# Altium PCB System.PcbDoc
Units mm, origin at the board's own origin, x right, y up, seen from the top; angles counter-clockwise.
Board outline 78 x 65.9 mm, 2 copper layers (Top Layer, Bottom Layer); 25 components, 40 nets, 249 pads, 7 vias.
Unrouted connection lines stored in the file: 14.
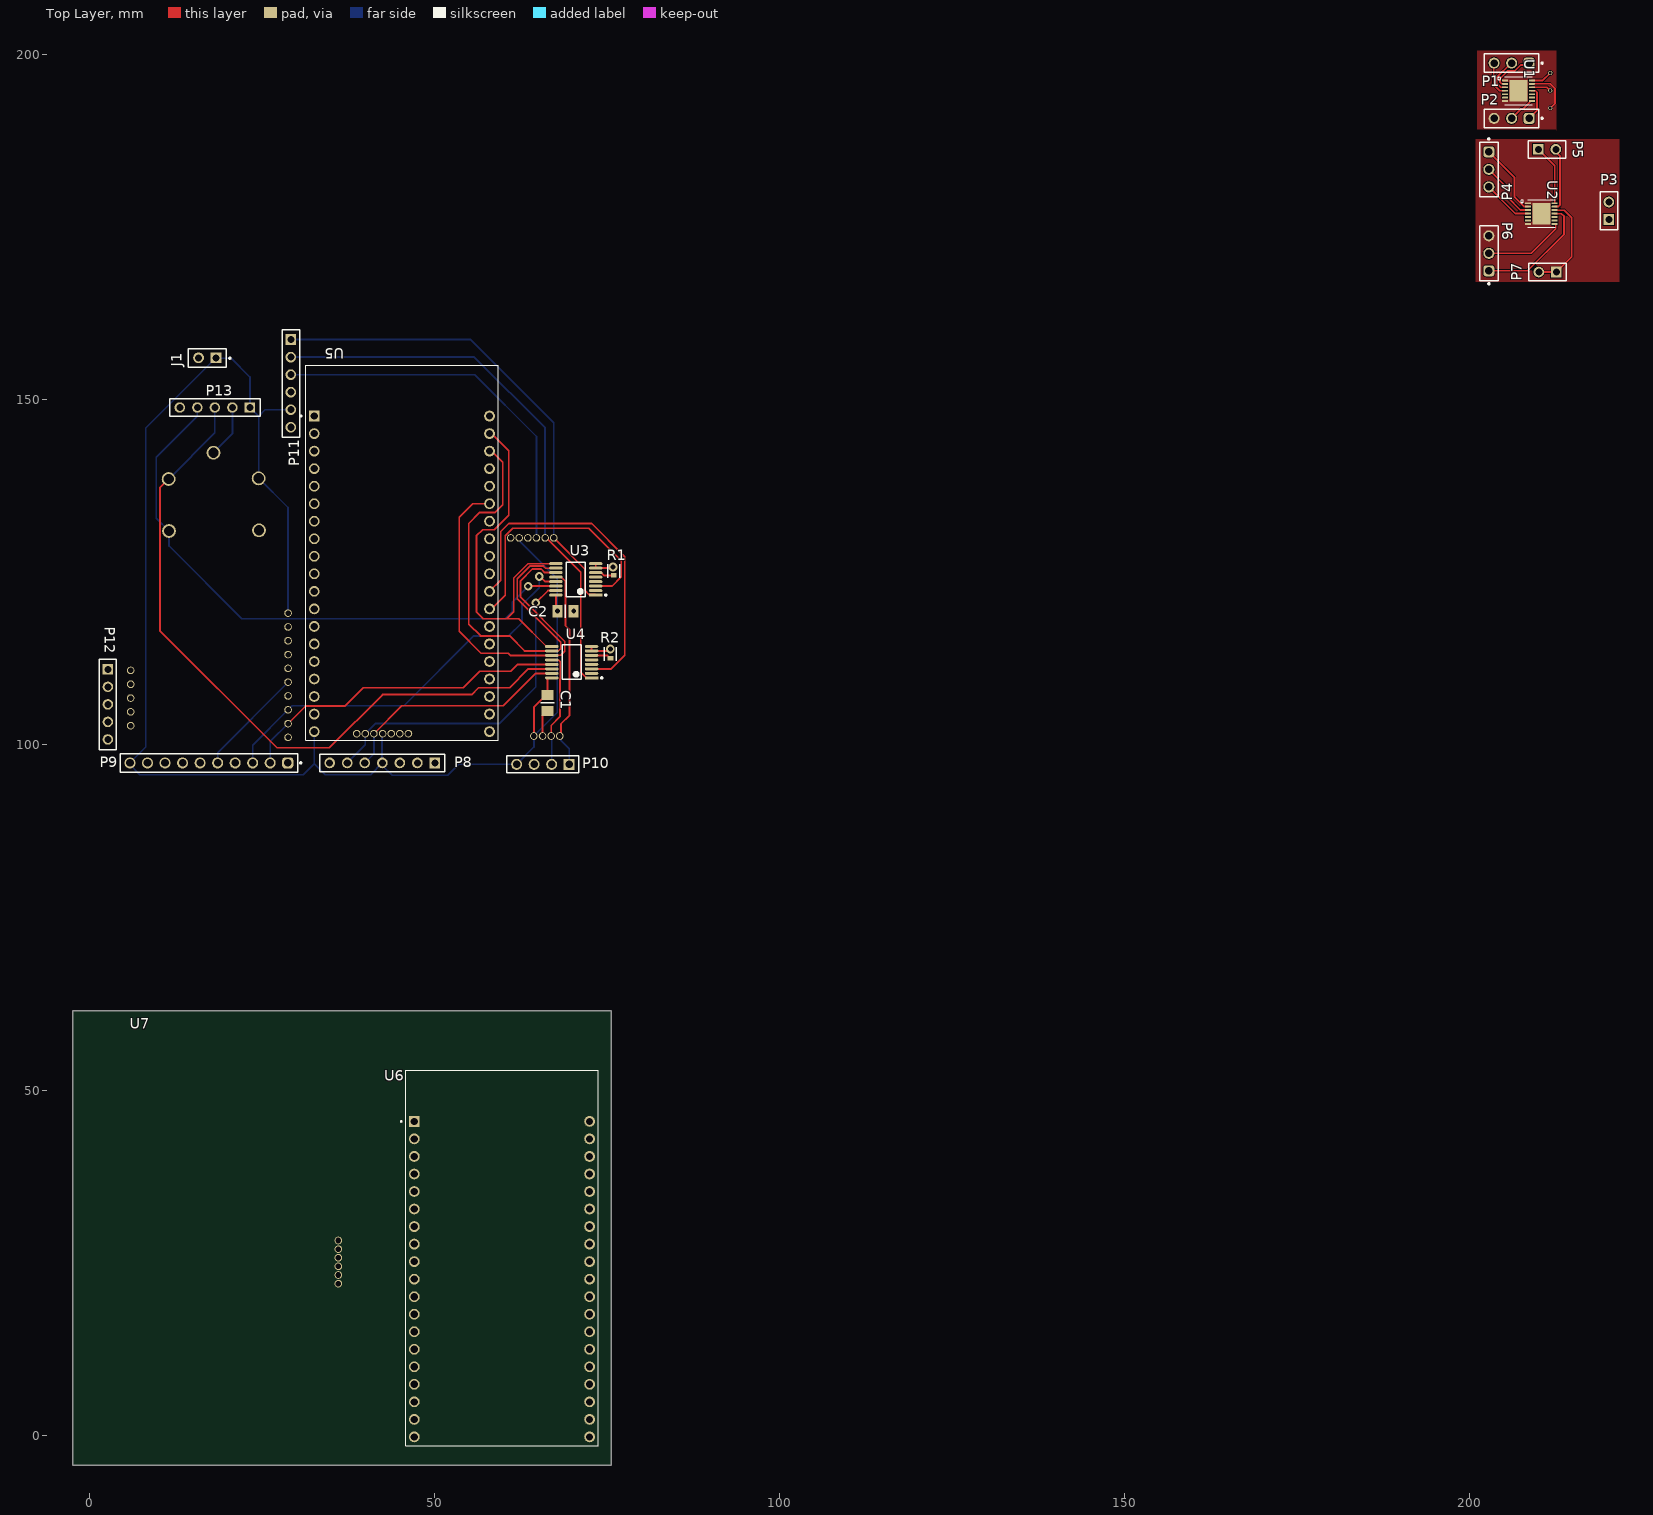
[diagram p0: Top Layer view]
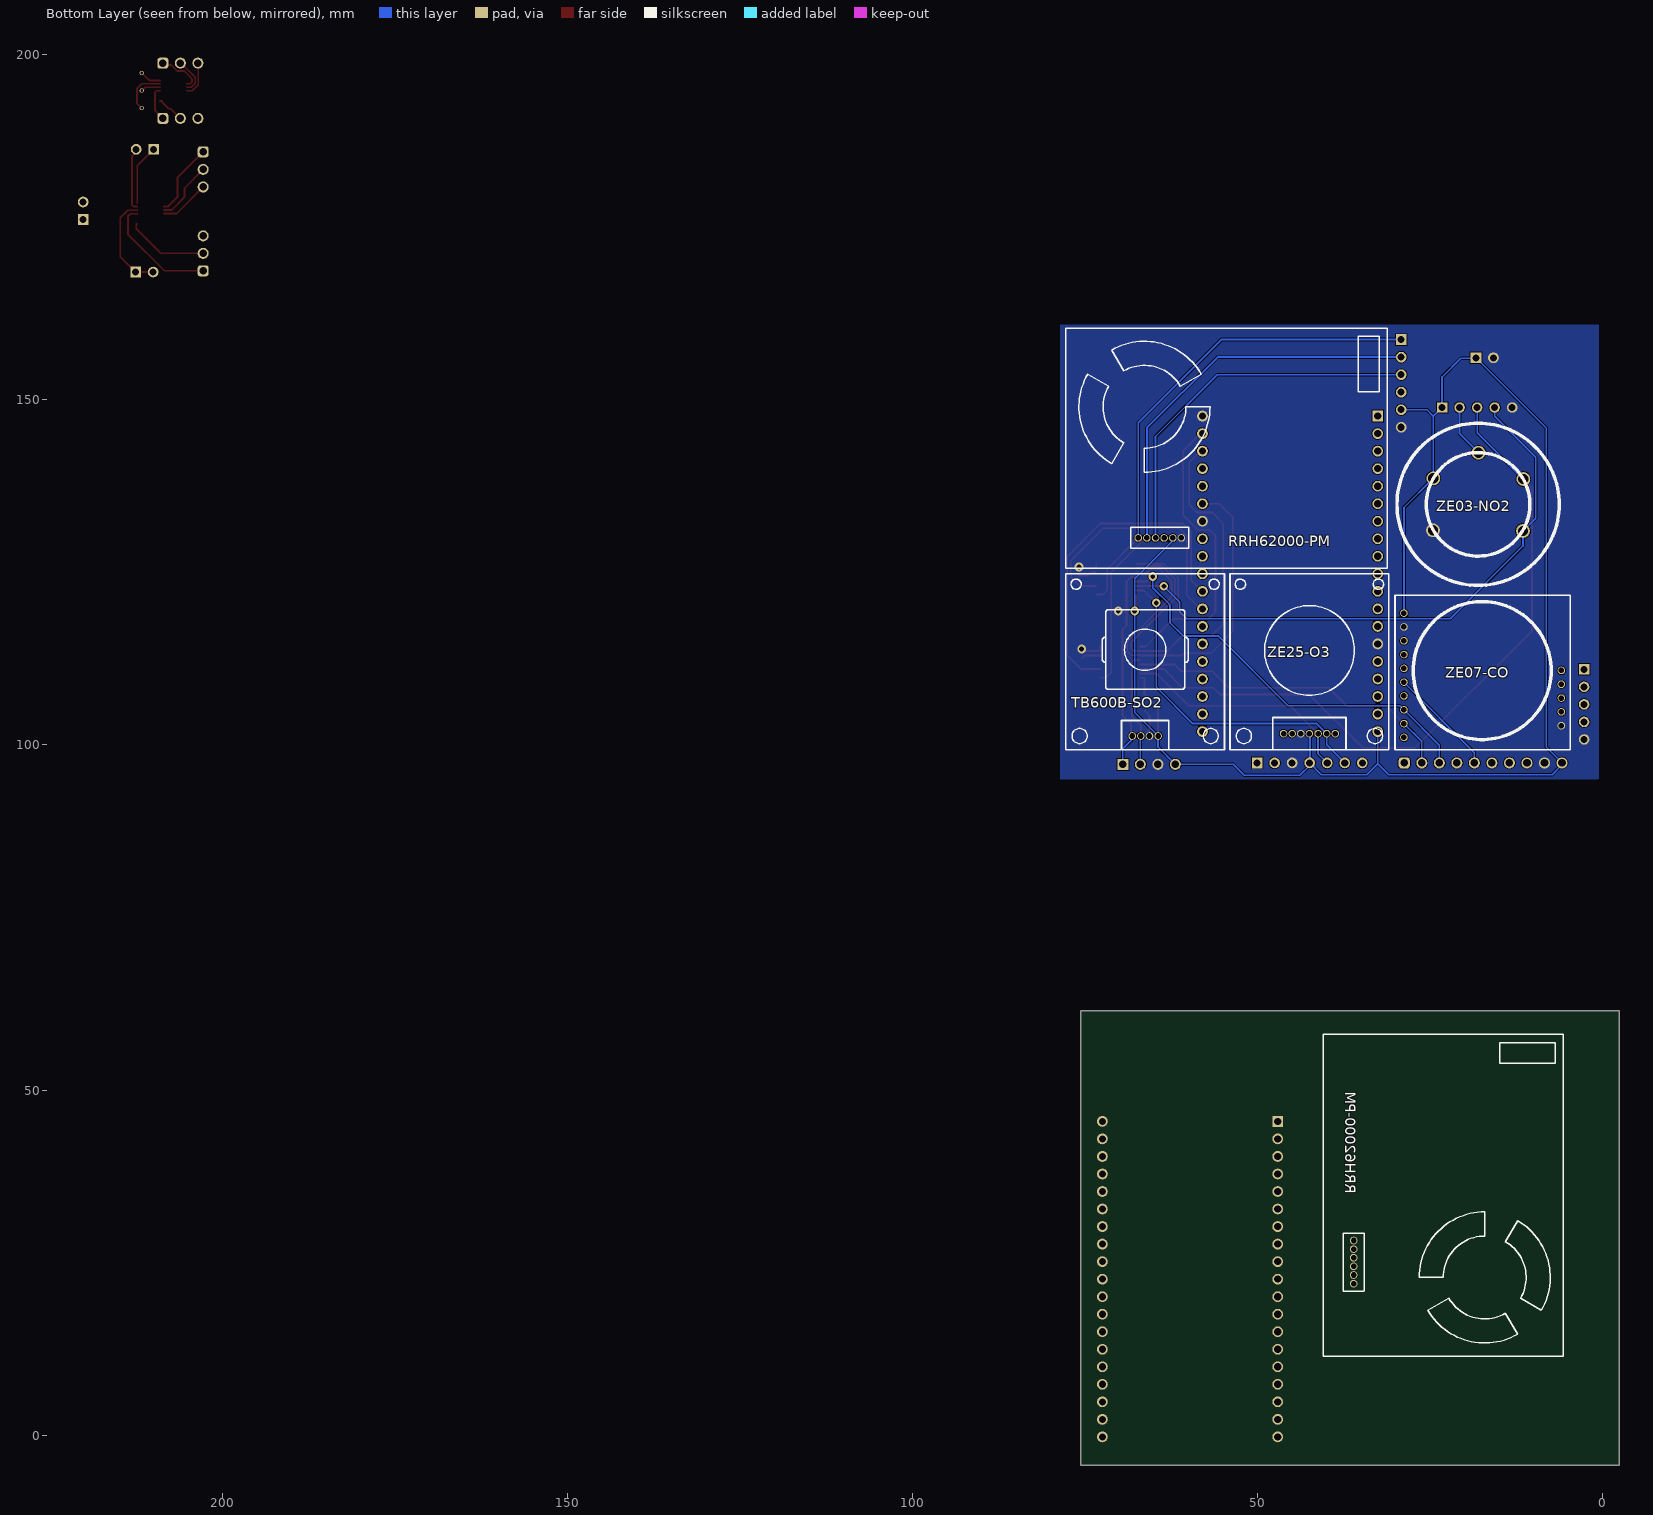
[diagram p1: Bottom Layer view, seen from below]

## Layer stack, top to bottom
Top Solder: solder mask 0.0102, Solder Resist, Dk 3.5
Top Layer: signal copper 0.0356
Dielectric 1: dielectric 0.32, FR-4, Dk 4.8
Bottom Layer: signal copper 0.0356
Bottom Solder: solder mask 0.0102, Solder Resist, Dk 3.5

## Board outline
-2.4,-4.4 -2.4,61.5 75.6,61.5 75.6,-4.4

## Design rules (kind name [scope] priority, off if disabled: settings)
Clearance 0.1 [All] p1: gap=0.1 ignorepadtopadclearanceinfootprint=TRUE
Clearance 0.2 [All] p2 off: gap=0.2 ignorepadtopadclearanceinfootprint=FALSE
Clearance [All] p3 off: gap=0.254 ignorepadtopadclearanceinfootprint=FALSE
FabricationTestpoint [All] p1: side=3 testpointundercomponent=TRUE minsize=1.016 maxsize=2.54 preferedsize=1.524 minholesize=0 maxholesize=1.016 preferedholesize=0.813 testpointgrid=0.025 allowsidetop=TRUE allowsidebottom=TRUE usegrid=TRUE gridoriginx=0 gridoriginy=-26.5 gridtolerance=0
PlaneConnect [All] p1: planeconnectstyle=Direct reliefexpansion=0.508 reliefentries=4 reliefconductorwidth=0.254 reliefairgap=0.254
PolygonConnect [All] p1: connectstyle=Direct reliefconductorwidth=0.254 reliefentries=4 polygonreliefangle="90 Angle" airgapwidth=0.254
RoutingVias [All] p1: holewidth=0.711 width=1.27 viastyle="Through Hole" minholewidth=0.711 minwidth=1.27 maxholewidth=0.711 maxwidth=1.27
SolderMaskExpansion [All] p1: expansion=0 istentingtop=FALSE
SupplyNets "Schematic Supply Nets_3" [InNet('Gnd')] p1: voltage=0.000
SupplyNets "Schematic Supply Nets_2" [InNet('+5')] p2: voltage=0.000
SupplyNets "Schematic Supply Nets" [InNet('GND2')] p3: voltage=0.000
SupplyNets "Schematic Supply Nets_1" [InNet('GND1')] p4: voltage=0.000
Width [All] p1: maxlimit=0.254 minlimit=0.254 preferedwidth=0.254
28 further rules are at their usual default settings.

## Classes and differential pairs
component class Prototype2: P14 U6 U7
component class Sensors: C1 C2 J1 P8 P9 P10 P11 P12 P13 R1 R2 U3 U4 U5
component class TIA: P1 P2 P3 P4 P5 P6 P7 U1 U2

## Components (designator, comment, footprint, x,y, rotation, side; value= is the part's Value field where it differs from the comment)
C1 "1uF" FP-GCJ31M-0_3-IPC_C 66.4,106.1 r270 top
C2 "1uF" FP-GCJ31M-0_3-IPC_C 69,119.4 r0 top
J1 "Type C" FP-TSW-102-22-G-S-MFG 17.1,156.1 r180 top
P1 "61300311121" 61300311121 206.1,198.8 r180 top
P2 "61300311121" 61300311121 206.1,190.8 r180 top
P3 "TSW-102-26-F-S" SMTC-TSW-102-26-XX-S 220.19,176.14 r90 top
P4 "61300311121" 61300311121 202.8,183.4 r270 top
P5 "TSW-102-26-F-S" SMTC-TSW-102-26-XX-S 209.96,186.3 r0 top
P6 "61300311121" 61300311121 202.8,171.24 r90 top
P7 "TSW-102-26-F-S" SMTC-TSW-102-26-XX-S 212.575,168.525 r180 top
P8 "ZE25-O3" SMTC-TSW-107-05-X-S 50.08,97.4 r180 top
P9 "ZE07-CO" 61301011121 17.33,97.4 r180 top
P10 "TB600B-SO2" SMTC-PHT-104-01-X-S 69.54,97.2 r180 top
P11 "RRH2000-PM" SMTC-TSW-106-23-X-S 29.2,158.74 r270 top
P12 "ZE07-CO" SMTC-MTLW-105-05-X-S-190 2.7,110.96 r270 top
P13 "ZE03-NO2" SMTC-MTLW-105-05-X-S-190 23.28,148.9 r180 top
R1 "10K" FP-MCT0603-IPC_C 76,125.2 r90 top
R2 "10K" FP-MCT0603-IPC_C 75.5,113.2 r90 top
U1 "Transimpedance Amplifier" SON50P400X400X80-14N 207.1,194.8 r0 top
U2 "Transimpedance Amplifier" SON50P400X400X80-14N 210.4,177 r0 top
U3 "74HC4051PW" FP-SOT403-1-IPC_A 70.5,124 r180 top
U4 "74HC4051PW" FP-SOT403-1-IPC_A 69.9,112 r180 top
U5 "ESP32-DEVKITC-32D" MODULE_ESP32-DEVKITC-32D 45.3,127.9 r0 top
U6 "ESP32-DEVKITC-32D" MODULE_ESP32-DEVKITC-32D 59.8,25.7 r0 top
U7 "PM Sensor" RRH62000 47.276,5.654 r90 top

## Footprints (in the part's own frame and the unit in brackets; to place one, negate y for a bottom-side part, rotate by r counter-clockwise, add the part's x,y. Pads: shape width x height; smd on the part's side, far side on the other; paste and mask are expansions set on the pad)
61300311121 [mm] "Pin Header, pitch 2.54 mm, THT, Vertical, single row, 3p"
  rrect50% 1.6x1.6 hole 1.1: 1(-2.54,0)
  round 1.6 hole 1.1: 2(0,0) 3(2.54,0)
  silkscreen extent -4.53,-1.35 3.96,1.35, body extent -3.81,-1.27 3.81,1.27, height 8.57
61301011121 [mm] "Pin Header, pitch 2.54 mm, THT, Vertical, single row, 10p"
  rrect50% 1.6x1.6 hole 1.1: 1(-11.43,0)
  round 1.6 hole 1.1: 2(-8.89,0) 3(-6.35,0) 4(-3.81,0) 5(-1.27,0) 6(1.27,0) 7(3.81,0) 8(6.35,0) 9(8.89,0) 10(11.43,0)
  silkscreen extent -13.42,-1.35 12.85,1.35, body extent -12.7,-1.27 12.7,1.27, height 8.57
FP-GCJ31M-0_3-IPC_C [mm]
  rect 1.453x1.804 smd paste+0 mask+0: 1(-1.175,0) 2(1.175,0)
  silkscreen extent 0,-0.95 0,0.95, body extent -1.6,-0.8 1.6,0.8, height 1.35
FP-MCT0603-IPC_C [mm]
  rect 0.664x0.862 smd paste+0 mask+0: 1(-0.629,0) 2(0.629,0)
  silkscreen extent -0.96,-0.87 0.96,0.87, body extent -0.77,-0.43 0.77,0.43, height 0.55
FP-SOT403-1-IPC_A [mm]
  rect 1.955x0.421 smd paste+0 mask+0: 1(-2.875,2.275)
  rrect100% 1.955x0.421 smd paste+0 mask+0: 2(-2.875,1.625) 3(-2.875,0.975) 4(-2.875,0.325) 5(-2.875,-0.325) 6(-2.875,-0.975) 7(-2.875,-1.625) 8(-2.875,-2.275) 9(2.875,-2.275) 10(2.875,-1.625) 11(2.875,-0.975) 12(2.875,-0.325) 13(2.875,0.325) 14(2.875,0.975) 15(2.875,1.625) 16(2.875,2.275)
  silkscreen extent -4.48,-2.5 1.4,2.5, body extent -4.35,-3 4.35,3, height 0.25
FP-TSW-102-22-G-S-MFG [mm]
  rect 1.57x1.57 hole 1.02 paste-2539.97 mask+0: 1(-1.27,0)
  round 1.57 hole 1.02 paste-2539.97 mask+0: 2(1.27,0)
  silkscreen extent -3.4,-1.34 2.73,1.34, body extent -2.83,-1.44 2.83,1.44, height 0.25
MODULE_ESP32-DEVKITC-32D [mm]
  rect 1.56x1.56 / inner round 1.56 / far side rect 1.56x1.56 hole 1.04: J2-1(-12.7,19.76)
  round 1.56 hole 1.04: J2-2(-12.7,17.22) J2-3(-12.7,14.68) J2-4(-12.7,12.14) J2-5(-12.7,9.6) J2-6(-12.7,7.06) J2-7(-12.7,4.52) J2-8(-12.7,1.98) J2-9(-12.7,-0.56) J2-10(-12.7,-3.1) J2-11(-12.7,-5.64) J2-12(-12.7,-8.18) J2-13(-12.7,-10.72) J2-14(-12.7,-13.26) J2-15(-12.7,-15.8) J2-16(-12.7,-18.34) J2-17(-12.7,-20.88) J2-18(-12.7,-23.42) J2-19(-12.7,-25.96) J3-1(12.7,19.76) J3-2(12.7,17.22) J3-3(12.7,14.68) J3-4(12.7,12.14) J3-5(12.7,9.6) J3-6(12.7,7.06) J3-7(12.7,4.52) J3-8(12.7,1.98) J3-9(12.7,-0.56) J3-10(12.7,-3.1) J3-11(12.7,-5.64) J3-12(12.7,-8.18) J3-13(12.7,-10.72) J3-14(12.7,-13.26) J3-15(12.7,-15.8) J3-16(12.7,-18.34) J3-17(12.7,-20.88) J3-18(12.7,-23.42) J3-19(12.7,-25.96)
  silkscreen extent -14.7,-27.25 13.95,27.15, body extent -13.97,-27.9 13.97,27.2, height 6.69
RRH62000 [mm] "PM Sensor"
  round 1.1 hole 0.8 paste-2539.97 mask+0.102: 1(16.296,11.176) 2(17.546,11.176) 3(18.796,11.176) 4(20.046,11.176) 5(21.296,11.176) 6(22.546,11.176)
  body extent 5.84,6.73 52.44,41.53, height 14
SMTC-MTLW-105-05-X-S-190 [mm] "Terminal Assembly, 1x5 Pins, Vertical, 2.54mm Pitch, Male"
  rect 1.52x1.52 hole 1.02: 1(0,0)
  round 1.52 hole 1.02: 2(2.54,0) 3(5.08,0) 4(7.62,0) 5(10.16,0)
  silkscreen extent -1.46,-1.24 11.62,1.24, body extent -1.27,-1.24 11.43,1.24, height 6.35
SMTC-PHT-104-01-X-S [mm] "Press Fit Socket Assembly, 1x4 Pins, Vertical, 2.54mm Pitch, Male"
  rect 1.6x1.6 hole 1.081: 1(0,0)
  round 1.6 hole 1.081: 2(2.54,0) 3(5.08,0) 4(7.62,0)
  silkscreen extent -1.4,-1.24 9.02,1.24, body extent -1.27,-1.25 8.89,1.25, height 8.38
SMTC-TSW-102-26-XX-S [mm] ".025 SQ Post Terminal Strip Assembly, 1x2 Pins, Vertical, 2.54mm Pitch, Male"
  rect 1.55x1.55 hole 1.02: 1(0,0)
  round 1.55 hole 1.02: 2(2.54,0)
  silkscreen extent -1.46,-1.27 4,1.27, body extent -1.4,-1.27 3.81,1.27, height 8.38
SMTC-TSW-106-23-X-S [mm] ".025 SQ Post Terminal Strip Assembly, 1x6 Pins, Vertical, 2.54mm Pitch, Male"
  rect 1.55x1.55 hole 1.02: 1(0,0)
  round 1.55 hole 1.02: 2(2.54,0) 3(5.08,0) 4(7.62,0) 5(10.16,0) 6(12.7,0)
  silkscreen extent -1.46,-1.27 14.16,1.27, body extent -1.27,-1.27 13.97,1.27, height 8.38
SMTC-TSW-107-05-X-S [mm] ".025 SQ Post Terminal Strip Assembly, 1x7 Pins, Vertical, 2.54mm Pitch, Male"
  rect 1.55x1.55 hole 1.02: 1(0,0)
  round 1.55 hole 1.02: 2(2.54,0) 3(5.08,0) 4(7.62,0) 5(10.16,0) 6(12.7,0) 7(15.24,0)
  silkscreen extent -1.46,-1.27 16.7,1.27, body extent -1.27,-1.27 16.51,1.27, height 5.21
SON50P400X400X80-14N [mm]
  rrect25% 0.86x0.27 smd: 1(-1.935,1.5) 2(-1.935,1) 3(-1.935,0.5) 4(-1.935,0) 5(-1.935,-0.5) 6(-1.935,-1) 7(-1.935,-1.5) 8(1.935,-1.5) 9(1.935,-1) 10(1.935,-0.5) 11(1.935,0) 12(1.935,0.5) 13(1.935,1) 14(1.935,1.5)
  rect 2.61x3.1 smd paste-3: 15(0,0)
  silkscreen extent -2.99,-2 2,2, body extent -2,-2 2,2, height 0.8

## Part data
C1 C2: library part CMP-06035-033047-1, "1uF +/- 10% Ceramic Capacitor, 50VDC, X7R Temperature Coefficient 15% Op Temp -55 to +125°C, 1206 Packaging"
J1: library part CMP-02766-000117-1, "CONN HEADER VERT 2POS 2.54MM", Housing Color=Black, Max Current Rating=7.6A, Max Operating Temperature=125°C, Max Voltage Rating (AC)=550V, Min Operating Temperature=-55°C, Contact Material=Bronze, Contact Plating=Gold, Depth=2.54mm, Gender=Male, Housing Material=Polyester, Length=5.08mm, Number of Contacts=2, Number of Rows=1, Orientation=Straight, Packaging=Bulk, Pitch=2.54mm, Radiation Hardening=No, REACH SVHC="No SVHC", Termination=Solder
P1 P2 P4 P6: library part CMP-1502-01062-4, "THT Vertical Pin Header WR-PHD, Pitch 2.54 mm, Single Row, 3 pins", Color=Black, Contact Resistance=20mΩ, Current Rating=3A, Max Operating Temperature=105°C, Min Operating Temperature=-40°C, Operating Supply Voltage=250V, Connector Type="Male Pin", Contact Material=Gold, Contact Mating Length=5.9944mm, Contact Plating=Gold, Gender=Male, Height=8.94mm, Lead Free="Lead Free", Lead Pitch=2.54mm, Mount="Through Hole", Number of Contacts=3, Number of Pins=3, Number of Positions=3, Number of Rows=1, Orientation=Vertical, Packaging=Bulk, Pitch=2.54mm, RoHS=Compliant, Termination=Solder, Voltage Rating=250V
P3 P5 P7: library part CMP-1024-00329-1, "0.025\" SQ Post Header, Through-hole, Vertical, -55 to 125 degC, 2.54 mm Pitch, 2-Pin, Male, RoHS", Manufacturer=Samtec, Temperature Range="-55 to 125 degC", ComponentLink1Description="Manufacturer URL", ComponentLink1URL=http://www.samtec.com, ComponentLink2Description=Datasheet, ComponentLink2URL=http://www.samtec.com/documents/webfiles/pdf/TSW_TH.PDF, ComponentLink3Description="Package Specification", ComponentLink3URL=http://www.samtec.com/documents/webfiles/cpdf/TSW-XXX-XX-XXX-X-XX-XXX-MKT.pdf, DatasheetVersion=F-214, Mounting Technology=Through-hole, Orientation=Vertical, PackageDescription=".025[0.64] SQ. Post Terminal Strip Assembly", PackageReference=TSW-102-26-XX-S, PackageVersion="DM, 8/1988", PartNumber=TSW-102-26-F-S, Pitch="2.54 mm", RoHS=True
P8: library part CMP-1024-00400-1, "0.025\" SQ Post Header, Through-hole, Vertical, -55 to 125 degC, 2.54 mm Pitch, 7-Pin, Male, RoHS", Manufacturer=Samtec, PartNumber=TSW-107-05-G-S, Temperature Range="-55 to 125 degC", ComponentLink1Description="Manufacturer URL", ComponentLink1URL=http://www.samtec.com, ComponentLink2Description=Datasheet, ComponentLink2URL=http://www.samtec.com/documents/webfiles/pdf/TSW_TH.PDF, ComponentLink3Description="Package Specification", ComponentLink3URL=http://www.samtec.com/documents/webfiles/cpdf/TSW-XXX-XX-XXX-X-XX-XXX-MKT.pdf, DatasheetVersion=F-214, Mounting Technology=Through-hole, Orientation=Vertical, PackageDescription=".025[0.64] SQ. Post Terminal Strip Assembly", PackageReference=TSW-107-05-X-S, PackageVersion="DM, 8/1988", Pitch="2.54 mm", RoHS=True
P9: library part CMP-1502-01082-6, "THT Vertical Pin Header WR-PHD, Pitch 2.54 mm, Single Row, 10 pins", Color=Black, Contact Resistance=20mΩ, Current Rating=3A, Flammability Rating="UL94 V-0", Insulation Resistance=1GΩ, Max Operating Temperature=105°C, Min Operating Temperature=-40°C, Operating Supply Voltage=250V, Connector Type="Male Pin", Contact Gender=Male, Contact Material=Gold, Contact Mating Length=5.9944mm, Contact Plating=Gold, Gender=Male, Height=8.74mm, Housing Material=PBT, Lead Pitch=2.54mm, Length=2.54mm, Mount="Through Hole", Number of Contacts=10, Number of Pins=10, Number of Positions=10, Number of Rows=1, Orientation=Vertical, Packaging=Bulk, Pitch=2.54mm, RoHS=Compliant, Termination=Solder, Voltage Rating=250V, Width=25.4mm
P10: library part CMP-1024-00182-1, "Press Fit Header, Through-hole, Vertical, -55 to 125 degC, 2.54 mm Pitch, 4-Pin, Male, RoHS", Manufacturer=Samtec, PartNumber=PHT-104-01-L-S, Temperature Range="-55 to 125 degC", ComponentLink1Description="Manufacturer URL", ComponentLink1URL=http://www.samtec.com, ComponentLink2Description=Datasheet, ComponentLink2URL=http://www.samtec.com/documents/webfiles/pdf/pht.pdf, ComponentLink3Description="Package Specification", ComponentLink3URL=http://www.samtec.com/documents/webfiles/cpdf/PHT-1XX-XX-X-X-XXX-MKT.pdf, DatasheetVersion=F-214, Mounting Technology=Through-hole, Orientation=Vertical, PackageDescription=".100 Press Fit Socket Assembly", PackageReference=PHT-104-01-X-S, PackageVersion="J, 9/2009", Pitch="2.54 mm", RoHS=True
P11: library part CMP-1024-00398-1, "0.025\" SQ Post Header, Through-hole, Vertical, -55 to 125 degC, 2.54 mm Pitch, 6-Pin, Male, RoHS", Manufacturer=Samtec, PartNumber=TSW-106-23-F-S, Temperature Range="-55 to 125 degC", ComponentLink1Description="Manufacturer URL", ComponentLink1URL=http://www.samtec.com, ComponentLink2Description=Datasheet, ComponentLink2URL=http://www.samtec.com/documents/webfiles/pdf/TSW_TH.PDF, ComponentLink3Description="Package Specification", ComponentLink3URL=http://www.samtec.com/documents/webfiles/cpdf/TSW-XXX-XX-XXX-X-XX-XXX-MKT.pdf, DatasheetVersion=F-214, Mounting Technology=Through-hole, Orientation=Vertical, PackageDescription=".025[0.64] SQ. Post Terminal Strip Assembly", PackageReference=TSW-106-23-X-S, PackageVersion="DM, 8/1988", Pitch="2.54 mm", RoHS=True
P12 P13: library part CMP-1024-00076-1, "Low Profile .025\" SQ Post Header, Through-hole, Vertical, -55 to 125 degC, 2.54 mm Pitch, 5-Pin, Male, RoHS", Manufacturer=Samtec, PartNumber=MTLW-105-05-G-S-190, Temperature Range="-55 to 125 degC", ComponentLink1Description="Manufacturer URL", ComponentLink1URL=http://www.samtec.com, ComponentLink2Description=Datasheet, ComponentLink2URL=http://www.samtec.com/documents/webfiles/pdf/MTLW_TH.PDF, ComponentLink3Description="Package Specification", ComponentLink3URL=http://www.samtec.com/documents/webfiles/cpdf/MTLW-1XX-XX-XX-X-XXX-XX-XX-MKT1.pdf, DatasheetVersion=F-214, Mounting Technology=Through-hole, Orientation=Vertical, PackageDescription="Low Profile Terminal Assembly", PackageReference=MTLW-105-05-X-S-190, PackageVersion="T, 6/1991", Pitch="2.54 mm", RoHS=True
R1 R2: library part CMP-02407-000775-1, "RES SMD 100 OHM 1% 1/8W 0603"
U1 U2: library part LMP91002, Supplier Part Number 1=LMP91002SDX/NOPB-ND, Supplier 1=DigiKey
U3 U4: library part CMP-14339-000004-1, "IC MUX/DEMUX 8X1 16TSSOP", RoHS Compliant=Yes
U5 U6: "WiFi Development Tools (802.11) ESP32 General Development Kit, ESP32-WROOM-32D on the board", Package=None, Check_prices=https://www.snapeda.com/parts/ESP32-DEVKITC-32D/Espressif+Systems/view-part/?ref=eda, MF="Espressif Systems", MP=ESP32-DEVKITC-32D, SnapEDA_Link=https://www.snapeda.com/parts/ESP32-DEVKITC-32D/Espressif+Systems/view-part/?ref=snap
U7: library part RRH62000, "PM sensor"

## Free pads (board coordinates)
  round 1.1 hole 0.8 paste-2539.97 mask-2539.97: 1(6,110.8) 1(46.25,101.65) 1(64.425,101.3) 2(6,108.8) 2(45,101.65) 2(65.675,101.3) 3(6,106.8) 3(43.75,101.65) 3(66.925,101.3) 4(6,104.8) 4(42.5,101.65) 4(68.175,101.3) 5(6,102.8) 5(41.25,101.65) 6(28.8,101.1) 6(40,101.65) 7(28.8,103.1) 7(38.75,101.65) 8(28.8,105.1) 9(28.8,107.1) 10(28.8,109.1) 11(28.8,111.1) 12(28.8,113.1) 13(28.8,115.1) 14(28.8,117.1) 15(28.8,119.1)
  round 2 hole 1.5 paste-2539.97 mask-2539.97: 1(24.6,131.1) 2(24.542,138.631) 3(17.992,142.346) 4(11.499,138.531) 5(11.556,131)
  round 1.1 hole 0.8 paste-2539.97 mask+0.102: 2(66.05,130) 2(67.3,130) 3(64.8,130) 4(63.55,130) 5(62.3,130) 6(61.05,130)
  round 0.6 hole 0.42 paste-2539.97 mask-2539.97: 14(211.7,197.375) 26(211.7,192.275)
  round 0.6 hole 0.42 mask-2539.97: 26(211.7,194.825)

## Via types
v1: diameter 1.27, hole 0.711, Top Layer to Bottom Layer, 7 vias

## Nets (pads, with @x,y where several pads share a name; then routed paths per layer and width w, separated by ;. In a path a pad name is that pad's centre, name@x,y a point inside that pad or via, vN(x,y) a via of type N, cw(c..) or ccw(c..) an arc to the next point about the centre after c; other vN are vias at no path point)
+5: C1.1 C2.1 J1.1 P8.4 P9.10 P10.4 P11.5 P13.1 pad.1@64.425,101.3 pad.2@24.542,138.631 pad.4@42.5,101.65 pad.5@62.3,130 pad.15 U3.16 U4.16 U5.J2-19 U6.J2-19 U7.5 | length 230.8
  Top Layer w0.254: pad.1@64.425,101.3 64.425,105.476 66.225,107.275 C1.1 66.4,109.648 66.477,109.725 U4.16 ; U3.16 67.625,119.6 v1(67.825,119.4)
  Bottom Layer w0.254: 24.533,147.647 25.466,148.58 P11.5 ; pad.15 28.8,134.415 24.584,138.631 24.542,138.631 24.542,147.638 P13.1 23.28,153.32 20.58,156.02 18.45,156.02 J1.1 8.2,145.93 8.2,99.7 P9.10 5.9,97.136 7.336,95.7 31,95.7 32.6,97.3 ; U5.J2-19 32.6,97.3 ; pad.4@42.4,101.65 42.4,97.1 43.9,95.6 51.928,95.6 53.528,97.2 P10.4 64.425,99.705 64.425,101.3 67.825,104.7 v1(67.825,119.4) 67.825,124.075 62.462,129.438 62.462,129.838 pad.5@62.3,130 ; P8.4 40.76,95.7 34.2,95.7 32.6,97.3
CE1: pad.14@211.7,197.375 U1.14 | length 3.1
  Top Layer w0.254: U1.14 210.625,196.3 pad.14@211.7,197.375
CE2: P5.1 U2.14 | length 8.8
  Top Layer w0.254: P5.1 212.335,183.925 U2.14
CO_ADC: P9.5 pad.10 | length 15.9
  Bottom Layer w0.254: P9.5 18.6,98.9 pad.10
CO_Rx: P9.2 pad.7@28.8,103.1 U4.13 | length 48.5
  Top Layer w0.254: pad.7@28.8,103.1 31.331,105.631 37.031,105.631 39.7,108.3 54.2,108.3 56.6,110.7 61.099,110.7 62.074,111.675 U4.13
  Bottom Layer w0.254: P9.2 26.22,100.52 pad.7@28.8,103.1
CO_Tx: P9.3 pad.8 U3.13 | length 59.4
  Top Layer w0.254: v1(65.2,124.4) 65.366,124.4 66.091,123.675 U3.13
  Bottom Layer w0.254: P9.3 23.68,99.98 pad.8 29.4,105.7 45.6,105.7 55.7,115.8 60.8,115.8 62.7,117.7 62.7,120.3 65.2,122.8 v1(65.2,124.4)
D16/Rx: U3.3 U5.J3-12 U6.J3-12 | length 37.5
  Top Layer w0.254: U5.J3-12 58.3,119.72 60.273,121.693 60.273,130.322 61.351,131.4 72.4,131.4 77.1,126.7 77.1,124.387 75.738,123.025 U3.3
D17/Tx: U4.3 U5.J3-11 U6.J3-11 | length 49.7
  Top Layer w0.254: U5.J3-11 59.625,123.885 59.625,130.925 60.8,132.1 72.8,132.1 77.6,127.3 77.6,112.987 75.638,111.025 U4.3
D21: U3.11 U4.11 U5.J3-6 U6.J3-6 | length 57.7
  Top Layer w0.254: U5.J3-6 55.56,134.96 53.6,133 53.6,116.459 56.759,113.3 60.7,113.3 61.025,112.975 U4.11 67.047,112.998 68.298,112.998 68.9,113.6 68.9,115 62.5,121.4 62.5,123.8 64.2,125.5 65.5,125.5 66.025,124.975 U3.11
D22: U3.10 U4.10 U5.J3-3 U6.J3-3 | length 63.7
  Top Layer w0.254: U5.J3-3 58.3,142.58 59.9,140.98 59.9,134.8 58.8,133.7 56.6,133.7 55,132.1 55,117.5 56.7,115.8 60.9,115.8 63.075,113.625 U4.10 67.057,113.657 67.99,113.657 68.3,113.967 68.3,114.9 62,121.2 62,124.1 63.821,125.921 65.807,125.921 66.103,125.625 U3.10
D23: U3.9 U4.9 U5.J3-2 U6.J3-2 | length 56.4
  Top Layer w0.254: U5.J3-2 58.3,145.12 60.8,142.62 60.8,133.3 58.7,131.2 57,131.2 56.1,130.3 56.1,119.3 57.1,118.3 60.5,118.3 ; U4.9 66.257,114.275 62.232,118.3 60.5,118.3 ; U3.9 63.575,126.275 61.5,124.2 61.5,119.3 60.5,118.3
Gnd: C1.2 C2.2 J1.2 P8.3 P9.9 P10.3 P11.6 P12.5 P13.5 pad.1@24.6,131.1 pad.2@65.675,101.3 pad.3@43.75,101.65 pad.5@6,102.8 pad.6@61.05,130 pad.14@28.8,117.1 R1.2 R2.2 U3.7 U3.8 U4.7 U4.8 U5.J2-14 U5.J3-1 U5.J3-7 U6.J2-14 U6.J3-1 U6.J3-7 U7.6 | length 11
  Top Layer w0.254: pad.2@65.675,101.3 65.675,104.325 66.275,104.925 C1.2 ; C2.2 v1(70.2,119.4) ; U4.8 U4.7 75.296,113.625 R2.2 v1(75.5,113.9) ; U3.8 U3.7 73.407,125.657 75.828,125.657 R1.2 75.971,125.8 v1(75.9,125.8)
GND1: P2.3 U1.1 U1.7 U1.15
GND2: P6.3 U2.1 U2.7 U2.15
MENB1: P1.1 U1.2 | length 6.5
  Top Layer w0.254: U1.2 205.157,195.808 204.649,195.808 204.408,196.049 204.408,196.551 205.518,197.66 206.554,197.66 207.421,198.527 208.367,198.527 P1.1
MENB2: P4.1 U2.2 | length 10.6
  Top Layer w0.254: P4.1 206.5,182.24 206.5,179.457 207.949,178.008 208.457,178.008 U2.2
NetR1_1: R1.1 U3.6 | length 2.8
  Top Layer w0.254: U3.6 74.17,124.975 74.575,124.571 R1.1
NetR2_1: R2.1 U4.6 | length 2.9
  Top Layer w0.254: U4.6 75.047,112.975 75.196,112.826 75.196,112.775 75.401,112.571 R2.1
NO2_ADC: P13.2 pad.3@17.992,142.346 | length 7.7
  Bottom Layer w0.254: pad.3@17.992,142.346 20.74,145.095 P13.2
NO2_Rx: P13.3 pad.4@11.499,138.531 U4.14 | length 104.2
  Top Layer w0.254: pad.4@11.499,138.531 10.24,137.272 10.24,116.56 27.2,99.6 34.8,99.6 42.5,107.3 55.4,107.3 56.4,108.3 60.9,108.3 63.625,111.025 U4.14
  Bottom Layer w0.254: pad.4@11.499,138.531 18.2,145.232 P13.3
NO2_Tx: P13.4 pad.5@11.556,131 U3.14 | length 86.5
  Top Layer w0.254: v1(63.6,123) 63.625,123.025 U3.14
  Bottom Layer w0.254: P13.4 15.66,147.66 9.7,141.7 9.7,132.856 11.556,131 11.556,128.844 22.1,118.3 60.3,118.3 61.3,119.3 61.3,120.7 v1(63.6,123)
O3_Rx: P8.5 pad.5@41.25,101.65 U4.15 | length 34.2
  Top Layer w0.254: pad.5@41.25,101.65 45.3,105.7 60,105.7 64.675,110.375 U4.15
  Bottom Layer w0.254: P8.5 41.25,98.73 pad.5@41.25,101.65
O3_Tx: P8.6 pad.6@40,101.65 U3.15 | length 48.7
  Top Layer w0.254: v1(64.7,120.6) 66.475,122.375 U3.15
  Bottom Layer w0.254: P8.6 40,100.02 40,101.65 41.45,103.1 59.4,103.1 64.7,108.4 v1(64.7,120.6)
PM_Rx/SDA: P11.2 pad.2@66.05,130 U4.1 U7.2 | length 80.6
  Top Layer w0.254: pad.2@66.05,130 66.201,130 71.2,125.001 71.2,110.533 72.008,109.725 U4.1
  Bottom Layer w0.254: P11.2 55.8,156.2 66.05,145.95 pad.2@66.05,130
PM_Sel: P11.3 pad.3@64.8,130 U7.3 | length 54
  Bottom Layer w0.254: P11.3 55.84,153.66 64.8,144.7 pad.3@64.8,130
PM_Tx/SCL: P11.1 pad.2@67.3,130 U3.1 U7.1 | length 71.1
  Top Layer w0.254: pad.2@67.3,130 71.8,125.5 71.8,122.4 72.392,121.808 73.292,121.808 U3.1
  Bottom Layer w0.254: P11.1 55.26,158.74 67.3,146.7 pad.2@67.3,130
RE1: pad.26@211.7,192.275 U1.13 | length 6.8
  Top Layer w0.254: U1.13 211.7,195.8 212.4,195.1 212.4,192.975 pad.26@211.7,192.275
RE2: P5.2 U2.13 | length 9.2
  Top Layer w0.254: U2.13 212.343,178.008 212.851,178.008 213.092,178.249 213.092,185.357 212.5,185.949 P5.2
SCL1: P1.2 U1.3 | length 5.3
  Top Layer w0.254: U1.3 205.157,195.308 204.507,195.308 203.954,195.861 203.954,196.739 206.015,198.8 P1.2
SCL2: P4.2 U2.3 | length 8.9
  Top Layer w0.254: P4.2 205.488,180.712 205.488,179.412 207.392,177.508 208.457,177.508 U2.3
SDA1: P1.3 U1.4 | length 5.2
  Top Layer w0.254: P1.3 203.5,198.74 203.5,195.673 204.365,194.808 205.157,194.808 U1.4
SDA2: P4.3 U2.4 | length 7.3
  Top Layer w0.254: P4.3 206.66,177 U2.4
SO2_Rx: P10.2 pad.3@66.925,101.3 U4.12 | length 16.7
  Top Layer w0.254: pad.3@66.925,101.3 66.925,102.825 68.2,104.1 68.2,109.515 68.229,109.544 68.229,112.071 68.007,112.293 67.057,112.293 U4.12 ; P10.2 P10.2@67.012,97.213
  Bottom Layer w0.254: P10.2@67.012,97.213 pad.3@67.012,101.288
SO2_Tx: P10.1 pad.4@68.175,101.3 U3.12 | length 29.5
  Top Layer w0.254: U3.12 68.392,124.325 69,123.717 69,117.3 69.6,116.7 69.6,104.3 68.337,103.037 68.337,101.462 pad.4@68.175,101.3
  Bottom Layer w0.254: pad.4@68.175,101.3 68.337,101.138 68.337,100.663 69.54,99.46 P10.1
Vout1: P2.2 U1.8 | length 4.1
  Top Layer w0.254: P2.2 207.477,192.177 207.795,192.177 208.732,193.115 208.732,193.292 208.74,193.3 U1.8
Vout2: P6.2 U2.8 | length 12
  Top Layer w0.254: P6.2 208.94,171.24 212.5,174.8 212.5,175.492 212.492,175.5 U2.8
VREF1: P2.1 U1.11 | length 5.1
  Top Layer w0.254: P2.1 209.792,191.952 209.792,194.551 209.551,194.792 209.043,194.792 U1.11
VREF2: P6.1 U2.11 | length 17.2
  Top Layer w0.254: P6.1 208.4,168.7 213.7,174 213.7,176.6 213.308,176.992 212.343,176.992 U2.11
WE1: pad.26@211.7,194.825 U1.12 | length 2.9
  Top Layer w0.254: U1.12 211.212,195.3 211.687,194.825 pad.26@211.7,194.825
WE2: P7.1 P7.2 U2.12 | length 14.3
  Top Layer w0.254: P7.2 P7.1 214.8,170.75 214.8,176.4 213.708,177.492 212.343,177.492 U2.12
pads on no net: P3.1 P3.2 P8.1 P8.2 P8.7 P9.1 P9.4 P9.6 P9.7 P9.8 P11.4 P12.1 P12.2 P12.3 P12.4 U1.5 U1.6 U1.9 U1.10 U2.5 U2.6 U2.9 U2.10 U3.2 U3.4 U3.5 U4.2 U4.4 U4.5 U5.J2-1 U5.J2-2 U5.J2-3 U5.J2-4 U5.J2-5 U5.J2-6 U5.J2-7 U5.J2-8 U5.J2-9 U5.J2-10 U5.J2-11 U5.J2-12 U5.J2-13 U5.J2-15 U5.J2-16 U5.J2-17 U5.J2-18 U5.J3-4 U5.J3-5 U5.J3-8 U5.J3-9 U5.J3-10 U5.J3-13 U5.J3-14 U5.J3-15 U5.J3-16 U5.J3-17 U5.J3-18 U5.J3-19 U6.J2-1 U6.J2-2 U6.J2-3 U6.J2-4 U6.J2-5 U6.J2-6 U6.J2-7 U6.J2-8 U6.J2-9 U6.J2-10 U6.J2-11 U6.J2-12 U6.J2-13 U6.J2-15 U6.J2-16 U6.J2-17 U6.J2-18 U6.J3-4 U6.J3-5 U6.J3-8 U6.J3-9 U6.J3-10 U6.J3-13 U6.J3-14 U6.J3-15 U6.J3-16 U6.J3-17 U6.J3-18 U6.J3-19 U7.4

## Polygon pours and split planes (outlines as drawn)
GND2 on Top Layer "GND2_L01_P001" (solid, pour order 1): 200.9,187.8 221.7,187.8 221.7,167 221.6,167.1 200.9,167.1
GND1 on Top Layer "GND1_L01_P000" (solid, remove dead copper, pour order 0): 201.1,200.6 212.6,200.6 212.6,189.1 212.5,189.2 201.1,189.2
Gnd on Bottom Layer "GND_L02_P002" (solid, pour order 2): 78.6,160.9 78.6,95 0.7,95 0.6,95.1 0.6,160.9 78.6,160.9

## Silkscreen, mask and mechanical layers (free items; w line width, h text height)
Bottom Overlay:
  circle w0.2: c75.8,101.3 r1.1
  circle w0.2: c76.3,123.3 r0.75
  circle w0.5: c18.058,134.867 r11.75
  circle w0.5: c18.058,134.867 r7.5
  circle w0.5: c17.47,110.78 r10
  circle w0.2: c66.3,113.8 r3
  circle w0.2: c33,101.3 r1.1
  circle w0.2: c52,101.3 r1.1
  circle w0.2: c56.8,101.3 r1.1
  circle w0.2: c52.5,123.3 r0.75
  circle w0.2: c32.5,123.3 r0.75
  circle w0.2: c42.5,113.7 r6.5
  circle w0.2: c56.3,123.3 r0.75
  lines w0.2: 60.025,115.317 60.025,112.283 60.308,112 60.508,112 ; 60.03,115.322 60.313,115.605 60.513,115.605 ; 60.575,119.353 60.575,108.35 ccw(c61.025,108.5) 60.875,108.05 71.625,108.05 ; 60.582,119.353 cw(c61.057,119.098) 60.857,119.598 ; 60.857,119.6 71.703,119.6 ; 68.368,131.525 59.975,131.525 59.975,128.5 68.375,128.5 68.375,131.518 ; 71.626,108.053 ccw(c71.625,108.5) 72.027,108.304 ; 71.703,119.592 cw(c71.573,119.109) 72.016,119.341 ; 72.025,108.298 72.025,119.341 ; 72.025,112 72.225,112 72.508,112.283 ; 72.025,115.6 72.03,115.605 72.23,115.605 72.513,115.322 72.513,112.288 ; 56.9,149 ccw(c66.4,149) 66.4,139.5 ; 56.9,149 ccw(c66.4,149) 66.4,139.5 ; 56.9,149 60.4,149 ; 56.9,149 60.4,149 ; 60.4,149 ccw(c66.4,149) 66.4,143 ; 60.4,149 ccw(c66.4,149) 66.4,143 ; 66.4,139.5 66.4,143 ; 66.4,139.5 66.4,143 ; 31.2,125.6 77.8,125.6 77.8,160.4 31.2,160.4 31.2,125.6 ; 32.4,151.2 35.4,151.2 35.4,159.2 32.4,159.2 32.4,151.2 ; 58.173,153.75 cw(c66.4,149) 71.15,157.227 69.4,154.196 ccw(c66.4,149) 61.204,152 58.173,153.75 ; 69.4,143.804 ccw(c66.4,149) 71.596,152 74.627,153.75 cw(c66.4,149) 71.15,140.773 69.4,143.804
  lines w0.254: 7.7,121.7 4.7,121.7 ; 62.875,99.35 62.875,103.55 69.725,103.55 69.725,99.3 62.925,99.3 ; 4.7,121.7 30.1,121.7 30.1,99.3 4.7,99.3 4.7,121.7 ; 31,99.3 31,124.8 54,124.8 54,99.3 31,99.3 ; 37.2,99.3 47.8,99.3 47.8,104 37.2,104 37.2,99.3 ; 54.8,99.3 77.8,99.3 77.8,124.8 54.8,124.8 54.8,99.3
  text "ZE03-NO2" at 24.152,133.851 h1.52
  text "RRH62000-PM" at 54.279,128.784 h1.52
  text "ZE25-O3" at 48.594,112.684 h1.52
  text "ZE07-CO" at 22.802,109.764 h1.52
  text "TB600B-SO2" at 77.041,105.384 h1.52
Top Solder:
  circle w0.5: c65.675,101.3 r0.25
  circle w0.5: c28.8,117.1 r0.25
  circle w0.5: c24.6,131.1 r0.25
  circle w0.5: c43.75,101.65 r0.25
  circle w0.5: c6,102.8 r0.25
  circle w0.5: c28.8,119.1 r0.25
  circle w0.5: c42.5,101.65 r0.25
  circle w0.5: c64.425,101.3 r0.25
  circle w0.5: c24.542,138.631 r0.25
  circle w0.5: c11.556,131 r0.25
  circle w0.5: c11.499,138.531 r0.25
  circle w0.5: c17.992,142.346 r0.25
  circle w0.5: c46.25,101.65 r0.25
  circle w0.5: c45,101.65 r0.25
  circle w0.5: c41.25,101.65 r0.25
  circle w0.5: c38.75,101.65 r0.25
  circle w0.5: c40,101.65 r0.25
  circle w0.5: c28.8,103.1 r0.25
  circle w0.5: c66.925,101.3 r0.25
  circle w0.5: c68.175,101.3 r0.25
  circle w0.5: c28.8,111.1 r0.25
  circle w0.5: c28.8,113.1 r0.25
  circle w0.5: c28.8,109.1 r0.25
  circle w0.5: c28.8,115.1 r0.25
  circle w0.5: c28.8,105.1 r0.25
  circle w0.5: c28.8,107.1 r0.25
  circle w0.5: c28.8,101.1 r0.25
  circle w0.5: c6,108.8 r0.25
  circle w0.5: c6,106.8 r0.25
  circle w0.5: c6,104.8 r0.25
  circle w0.5: c6,110.8 r0.25
  circle w0.5: c211.7,192.275 r0.25
  circle w0.5: c211.7,197.375 r0.25
  circle w0.5: c211.7,194.825 r0.25
Bottom Solder:
  circle w0.5: c65.675,101.3 r0.25
  circle w0.5: c28.8,117.1 r0.25
  circle w0.5: c24.6,131.1 r0.25
  circle w0.5: c43.75,101.65 r0.25
  circle w0.5: c6,102.8 r0.25
  circle w0.5: c28.8,119.1 r0.25
  circle w0.5: c42.5,101.65 r0.25
  circle w0.5: c64.425,101.3 r0.25
  circle w0.5: c24.542,138.631 r0.25
  circle w0.5: c11.556,131 r0.25
  circle w0.5: c11.499,138.531 r0.25
  circle w0.5: c17.992,142.346 r0.25
  circle w0.5: c46.25,101.65 r0.25
  circle w0.5: c45,101.65 r0.25
  circle w0.5: c41.25,101.65 r0.25
  circle w0.5: c38.75,101.65 r0.25
  circle w0.5: c40,101.65 r0.25
  circle w0.5: c28.8,103.1 r0.25
  circle w0.5: c66.925,101.3 r0.25
  circle w0.5: c68.175,101.3 r0.25
  circle w0.5: c28.8,111.1 r0.25
  circle w0.5: c28.8,113.1 r0.25
  circle w0.5: c28.8,109.1 r0.25
  circle w0.5: c28.8,115.1 r0.25
  circle w0.5: c28.8,105.1 r0.25
  circle w0.5: c28.8,107.1 r0.25
  circle w0.5: c28.8,101.1 r0.25
  circle w0.5: c6,108.8 r0.25
  circle w0.5: c6,106.8 r0.25
  circle w0.5: c6,104.8 r0.25
  circle w0.5: c6,110.8 r0.25
  circle w0.5: c211.7,192.275 r0.25
  circle w0.5: c211.7,197.375 r0.25
  circle w0.5: c211.7,194.825 r0.25
Mechanical 1:
  lines w0.254: 200.9,167 221.715,167 221.715,187.815 200.9,187.815 200.9,167 ; 201.1,189.1 212.6,189.1 212.6,200.6 201.1,200.6 201.1,189.1

## Text inside footprints (layer, text, board x,y; h text height)
U7: Bottom Overlay "RRH62000-PM" at 37.316,34.971 h1.52 r90